# Altium PCB PCB4.PcbDoc
Units mm, origin at the board's own origin, x right, y up, seen from the top; angles counter-clockwise.
Board outline 83 x 83 mm, 4 copper layers (Top Layer, Internal Plane 1, Internal Plane 2, Bottom Layer); 24 components, 26 nets, 113 pads, 0 vias.
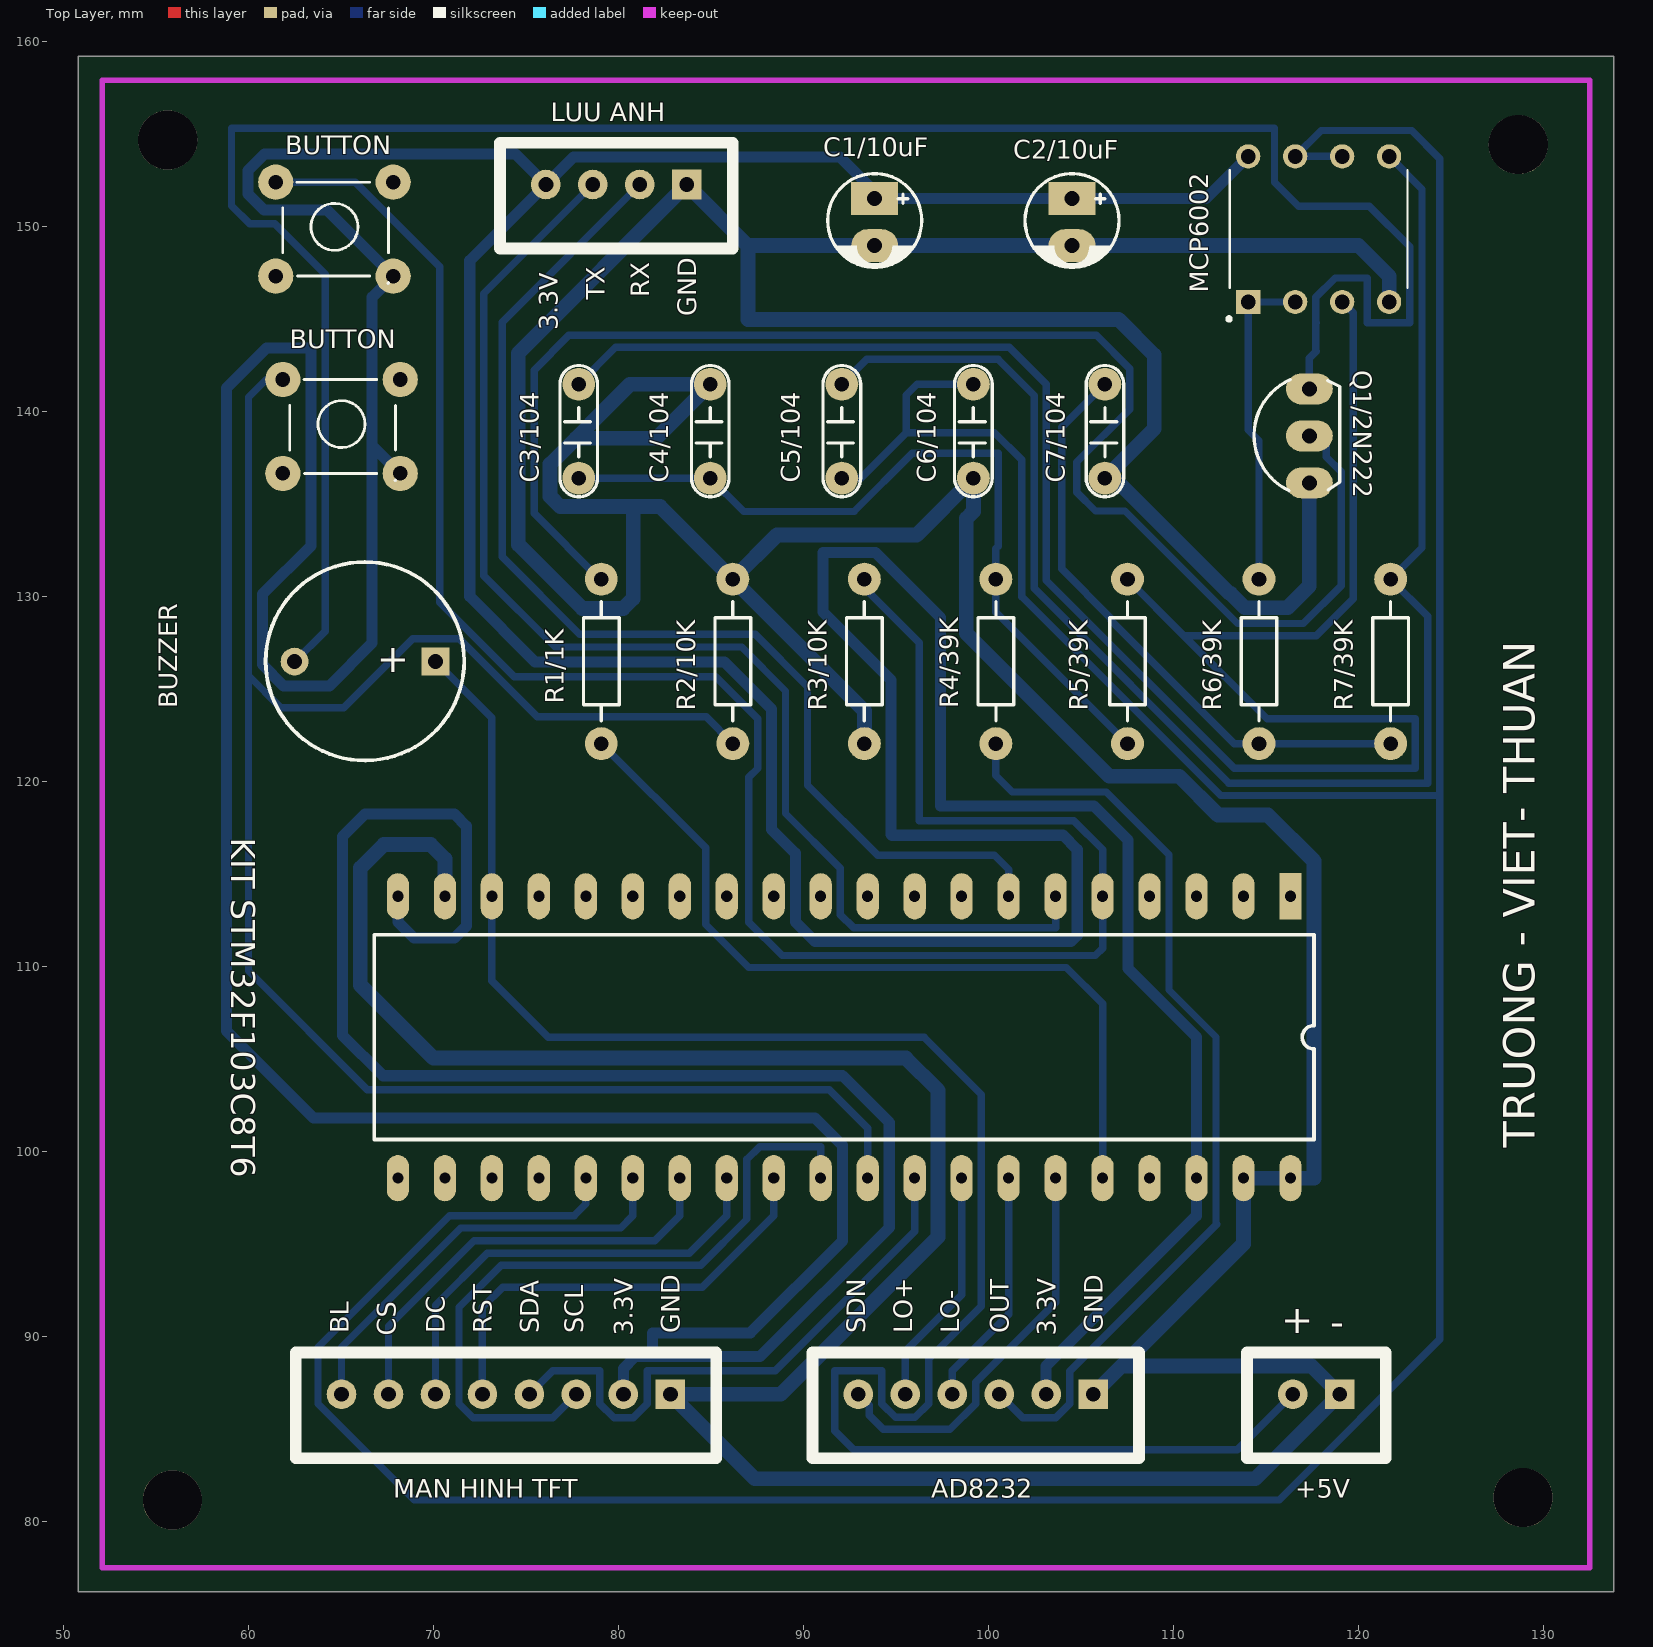
[diagram p0: Top Layer view]
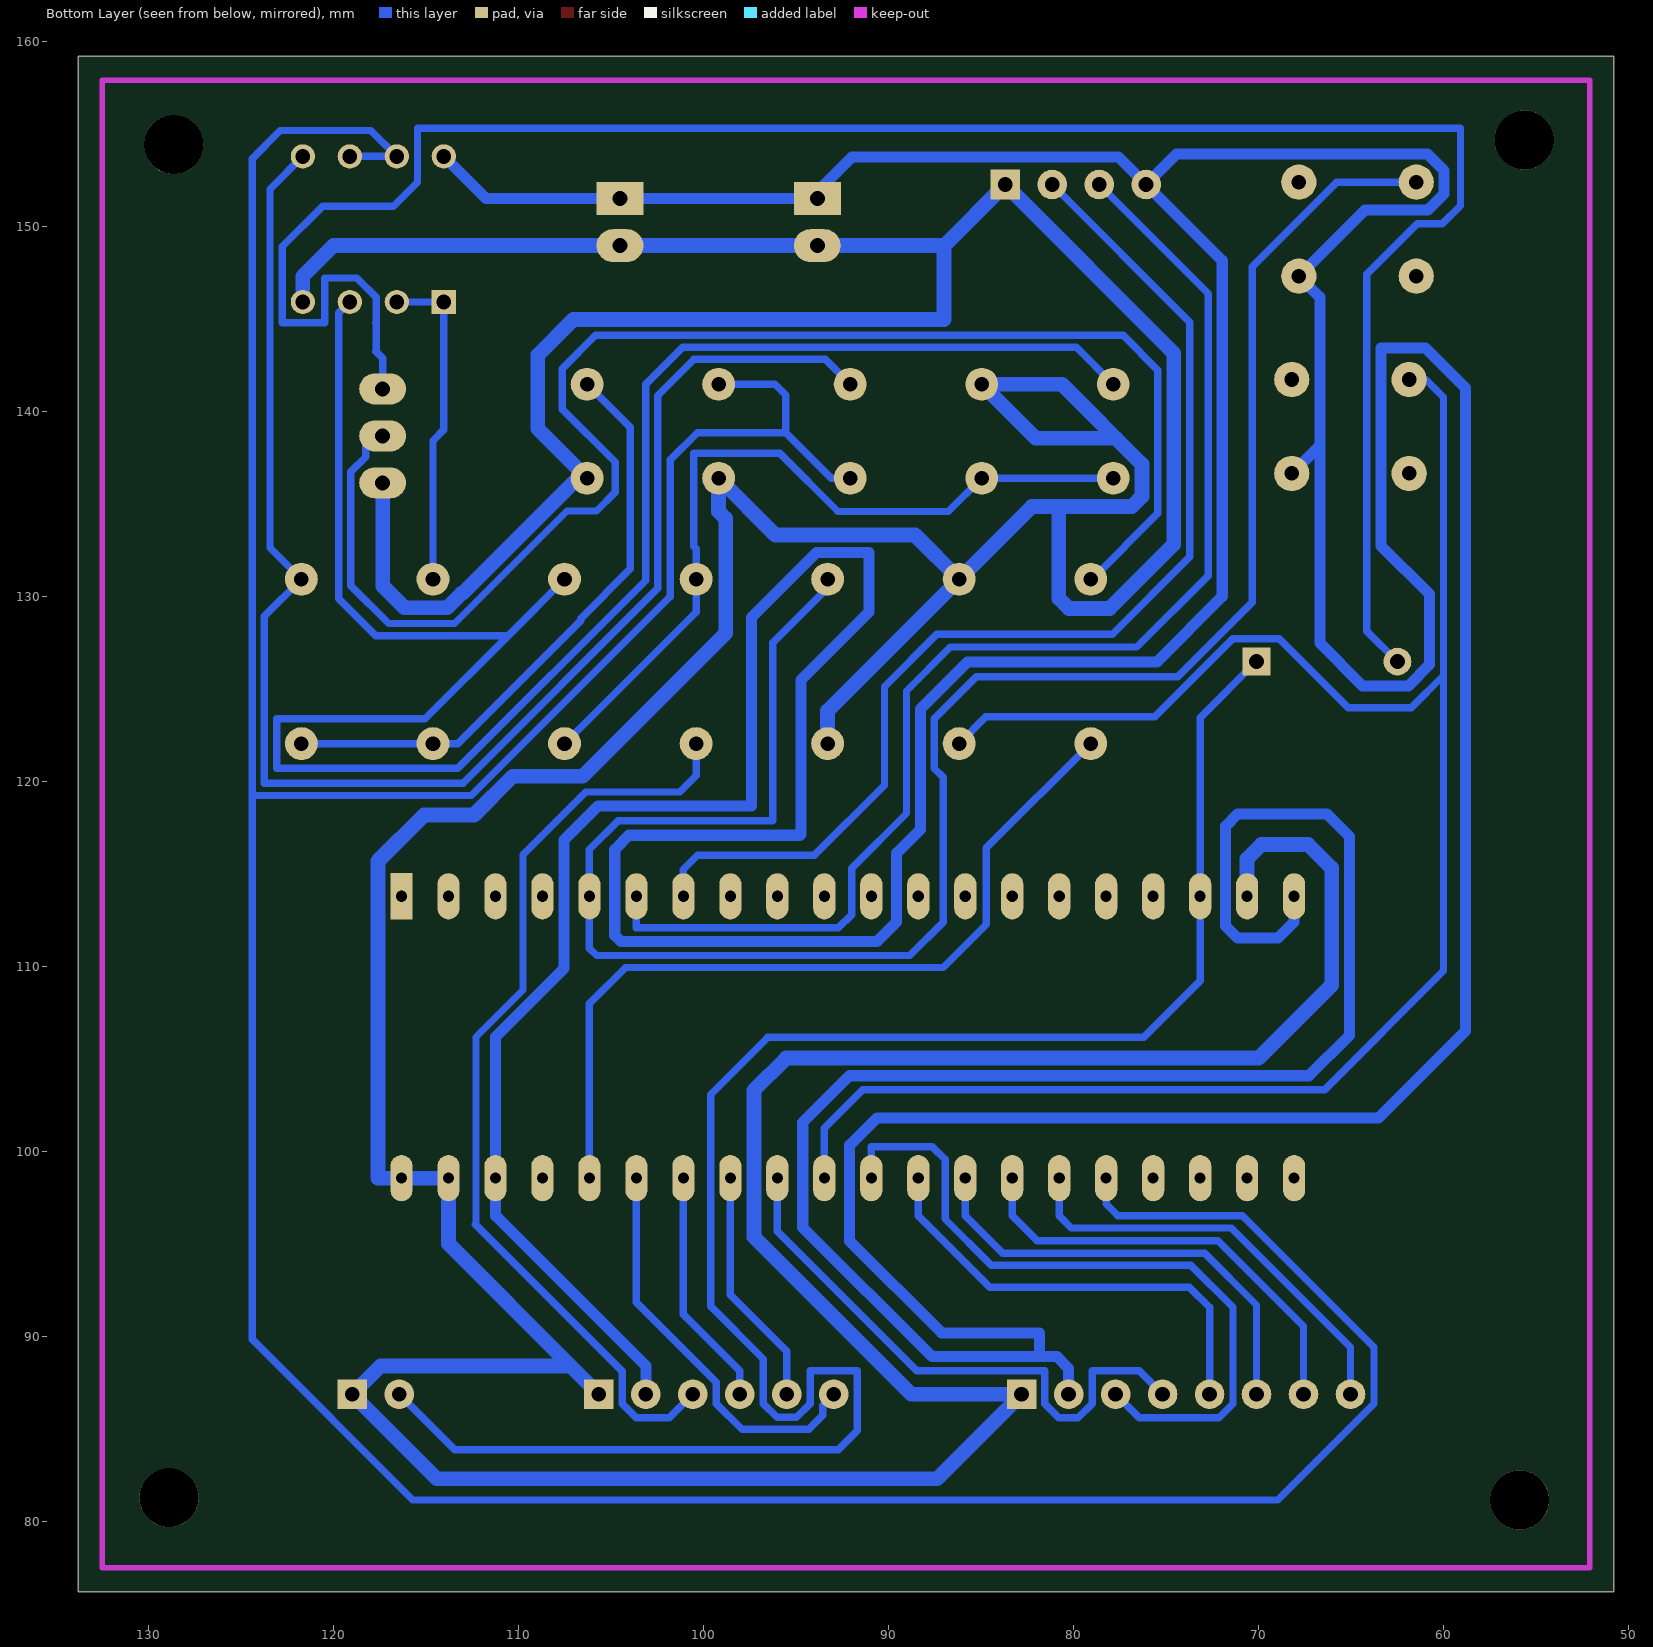
[diagram p1: Bottom Layer view, seen from below]
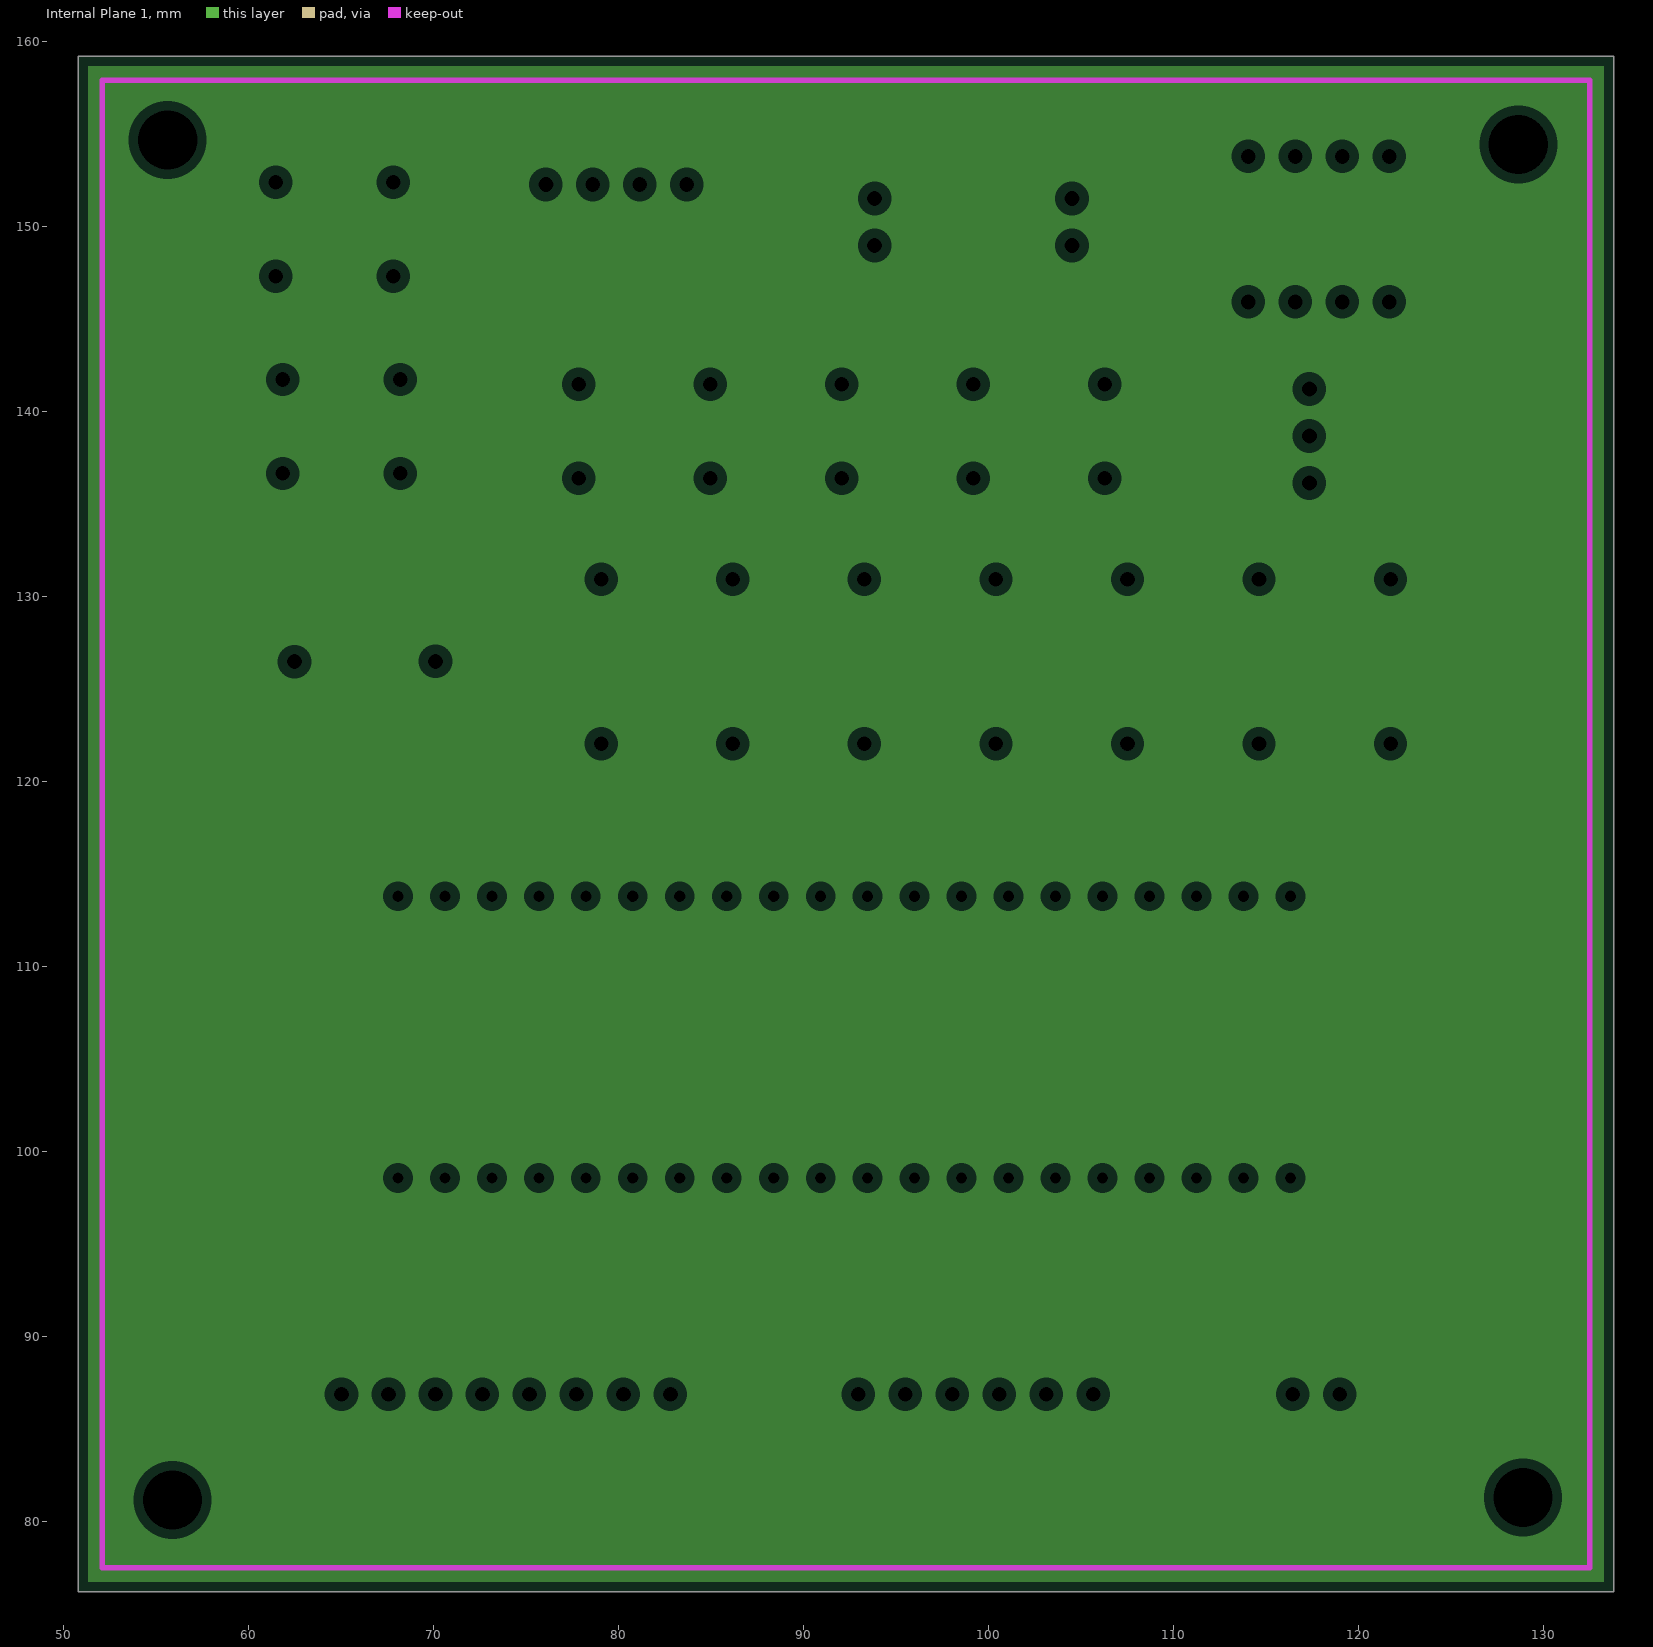
[diagram p2: Internal Plane 1, clearances drawn from the general rule]
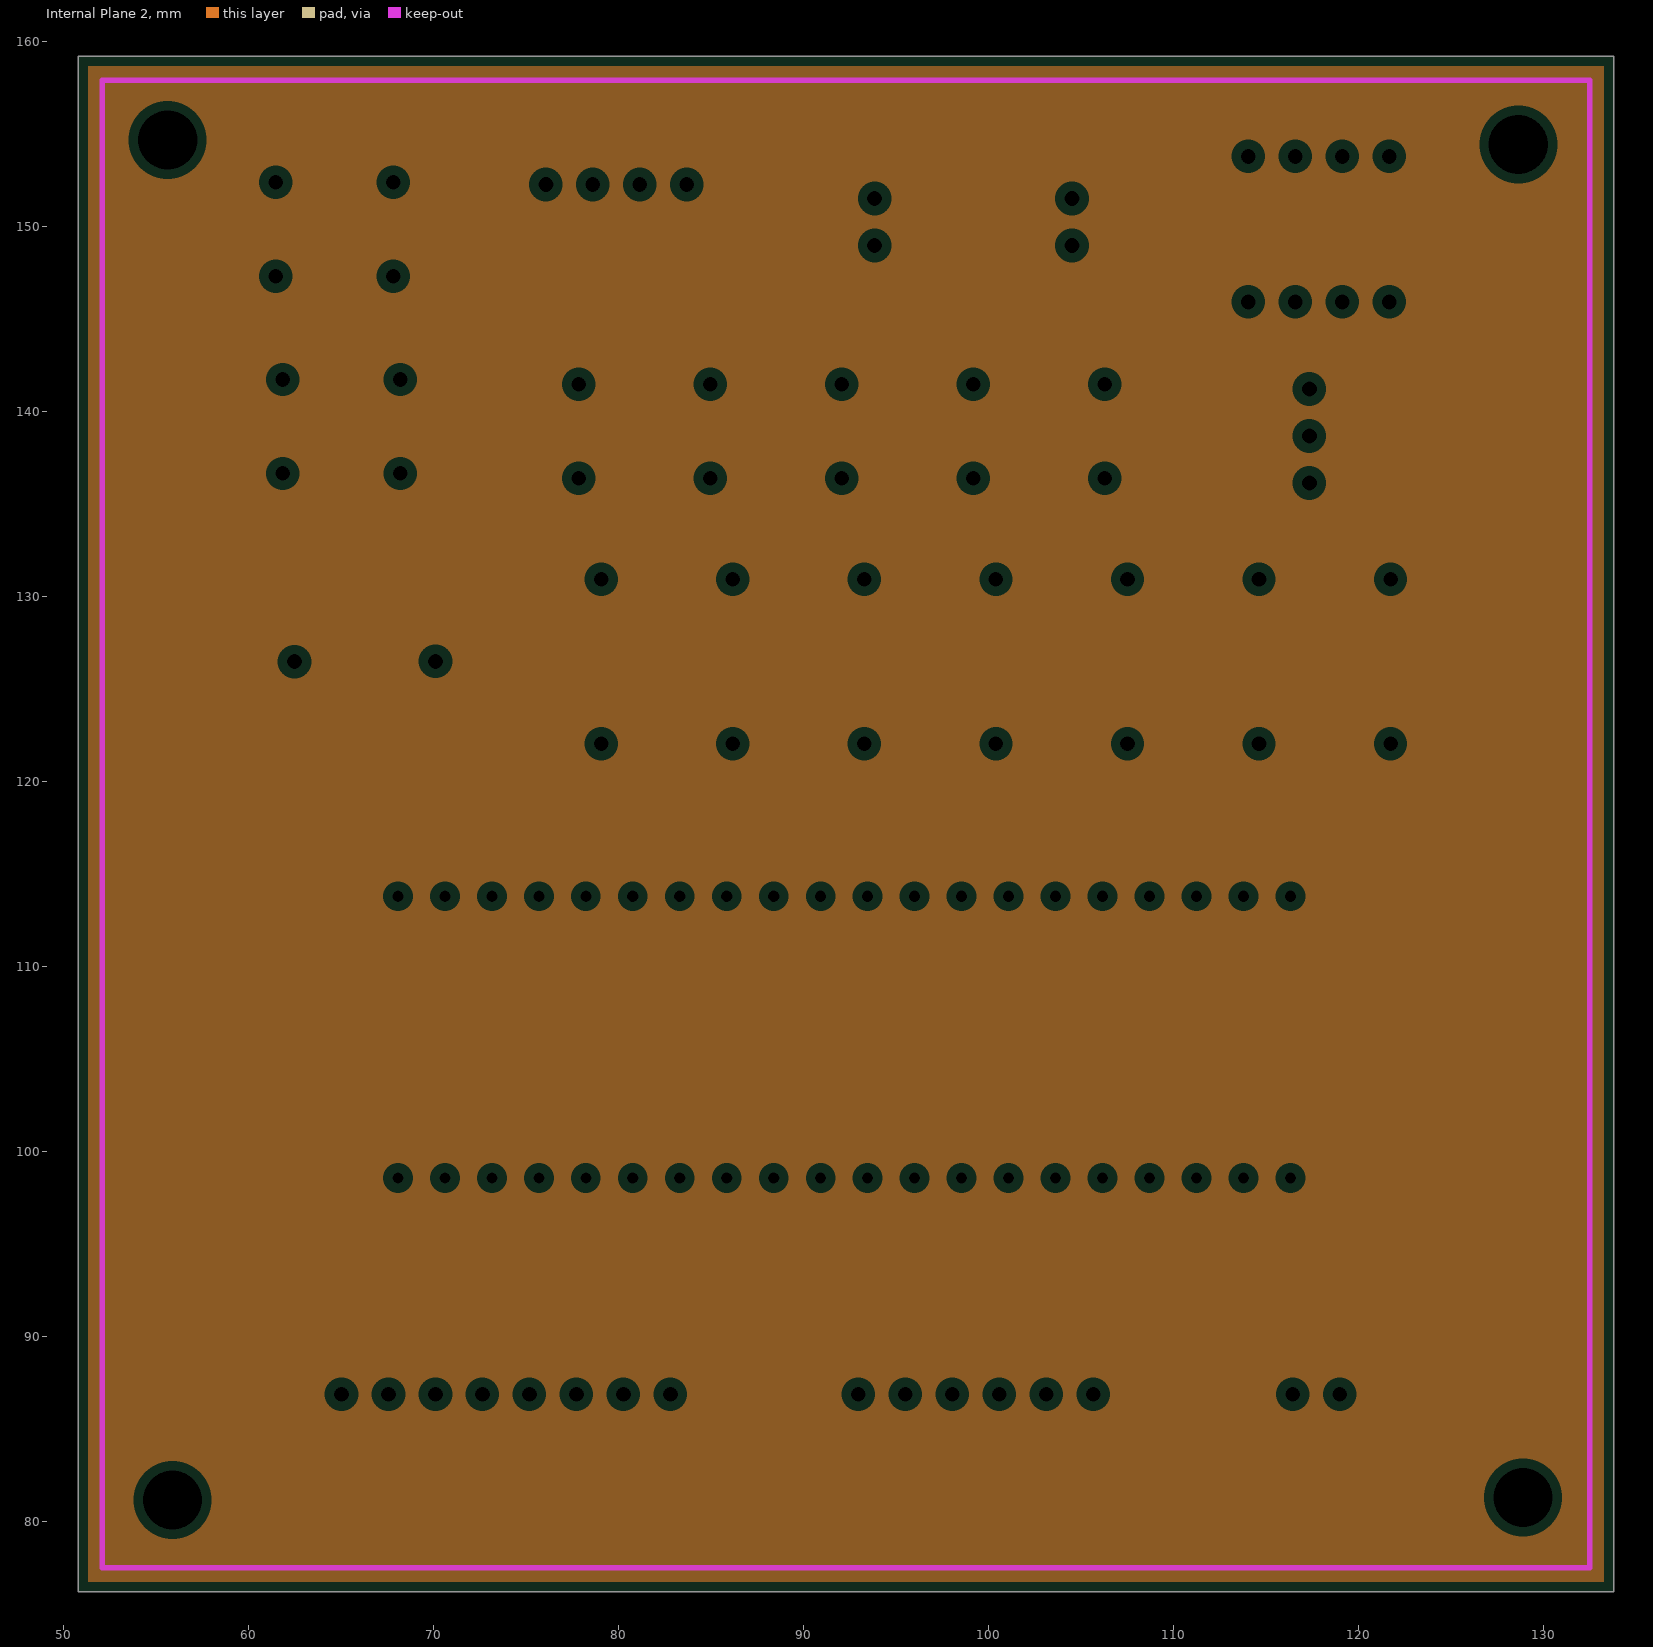
[diagram p3: Internal Plane 2, clearances drawn from the general rule]
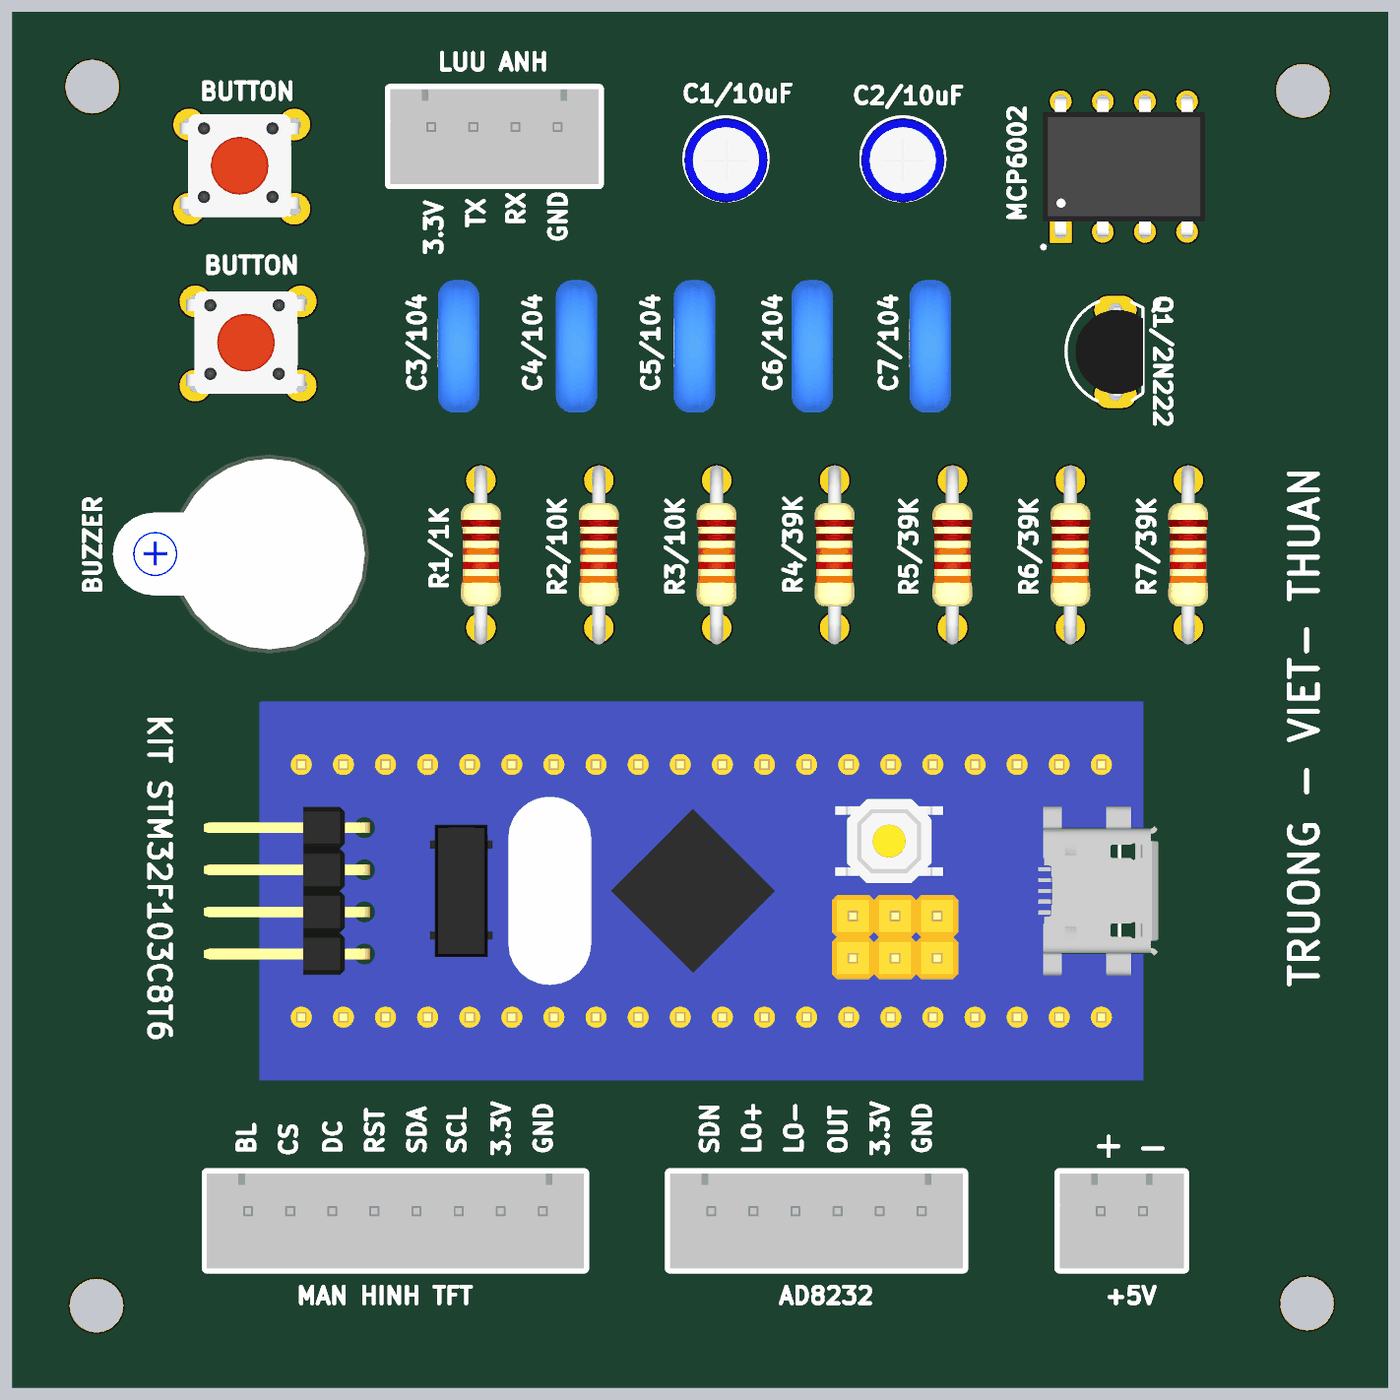
[diagram p4: 3D render of the assembled board from above, using the file's embedded part models]

## Layer stack, top to bottom
Top Layer: signal copper 0.0356
Dielectric: dielectric 0.32, FR-4, Dk 4.8
Internal Plane 1: plane copper 0.0356
Dielectric: dielectric 0.32, FR-4, Dk 4.8
Internal Plane 2: plane copper 0.0356
Dielectric: dielectric 0.32, FR-4, Dk 4.8
Bottom Layer: signal copper 0.0356

## Board outline
50.8,76.2 133.8,76.2 133.8,159.2 50.8,159.2

## Design rules (kind name [scope] priority, off if disabled: settings)
Clearance [All] p1: gap=0.25
PlaneClearance [All] p1: clearance=0.508
PlaneConnect [All] p1: planeconnectstyle=Relief reliefexpansion=0.508 reliefentries=4 reliefconductorwidth=0.254 reliefairgap=0.254
PolygonConnect [All] p1: connectstyle=Relief reliefconductorwidth=0.254 reliefentries=4 polygonreliefangle="90 Angle"
RoomDefinition "SO DO NGUYEN LY" [InComponentClass('SO DO NGUYEN LY')] p1: confinementstyle=ConfineIn formatcopy=TRUE lockcomponents=FALSE outline 135.001,77.851 310.007,77.851 310.007,138.303 135.001,138.303
RoutingLayers [All] p1: top layer_v5=FALSE bottom layer_v5=TRUE
RoutingVias [All] p1: holewidth=0.6 width=1 viastyle="Through Hole" minholewidth=0.711 minwidth=1.27 maxholewidth=0.711 maxwidth=1.27
SilkscreenOverComponentPads [All] p1: minsilkscreentomaskgap=0.254
SolderMaskExpansion [All] p1: expansion=0.102
Width GND [InNet('GND')] p1: maxlimit=0.8 minlimit=0.8 preferedwidth=0.8
Width 3.3V [InNet('3.3V')] p2: maxlimit=0.6 minlimit=0.6 preferedwidth=0.6
Width NET [All] p3: maxlimit=0.4 minlimit=0.4 preferedwidth=0.4
24 further rules are at their usual default settings.

## Components (designator, comment, footprint, x,y, rotation, side; value= is the part's Value field where it differs from the comment)
+5V "Header 2P CAP NGUON 5V" XH2.54M-2 118.999,86.868 r180 top (schematic designator H1)
AD8232 "Header 6P 2.54 - AD8232" XH2.54M-6 105.664,86.868 r180 top (schematic designator H2)
BUTTON "SW" SW4 61.849,141.732 r0 top (schematic designator UP1)
BUTTON "SW" SW4 61.468,152.4 r0 top (schematic designator DOWN1)
BUZZER "Speaker" SPEAKER 70.104,126.492 r180 top (schematic designator LS1)
C1/10uF "10uF" CP1/2 93.853,151.511 r270 top (schematic designator C1)
C2/10uF "10uF" CP1/2 104.521,151.511 r270 top (schematic designator C2)
C3/104 "104" CN2 77.851,136.398 r90 top (schematic designator C3)
C4/104 "104" CN2 84.963,136.398 r90 top (schematic designator C4)
C5/104 "104" CN2 92.075,136.398 r90 top (schematic designator C5)
C6/104 "104" CN2 99.187,136.398 r90 top (schematic designator C6)
C7/104 "104" CN2 106.299,136.398 r90 top (schematic designator C7)
"KIT STM32F103C8T6" "KIT STM32F103C8T6" "STM32F103 KIT" 116.332,113.792 r270 top
"LUU ANH" "Header 4P KHOI LUU HINH ANH" XH2.54M-4 83.693,152.273 r180 top (schematic designator H4)
"MAN HINH TFT" "Header 8P 2.54 CAM MAN HINH" XH2.54M-8 82.804,86.868 r180 top (schematic designator H3)
MCP6002 "MCP6002-I/P" DIP787W46P254L927H533Q8 117.856,149.86 r90 top (schematic designator U1)
Q1/2N222 "2N222" TO92-123 117.348,138.684 r90 top (schematic designator Q1)
R1/1K "1k" R1/4W 79.07,122.047 r90 top (schematic designator R1)
R2/10K "10k" R1/4W 86.182,122.047 r90 top (schematic designator R2)
R3/10K "10k" R1/4W 93.294,122.047 r90 top (schematic designator R3)
R4/39K "39K" R1/4W 100.406,122.047 r90 top (schematic designator R4)
R5/39K "39K" R1/4W 107.518,122.047 r90 top (schematic designator R5)
R6/39K "39K" R1/4W 114.63,122.047 r90 top (schematic designator R6)
R7/39K "39K" R1/4W 121.742,122.047 r90 top (schematic designator R7)

## Footprints (in the part's own frame and the unit in brackets; to place one, negate y for a bottom-side part, rotate by r counter-clockwise, add the part's x,y. Pads: shape width x height; smd on the part's side, far side on the other; paste and mask are expansions set on the pad)
CN2 [mil]
  round 70 hole 31: 1(0,0) 2(200,0)
  silkscreen extent -40,-40 240,40, body extent -54,-44 260,55, height 407
CP1/2 [mil] "Tu hoa < 22uF/16>50V"
  rect 70x100 hole 32: 1(0,0)
  oval 70x100 hole 32: 2(100,0)
  silkscreen extent -53,-100 146,100, body extent -49,-99 149,99, height 287
DIP787W46P254L927H533Q8 [mm]
  rect 1.308x1.308 / inner round 1.308 / far side rect 1.308x1.308 hole 0.8: 1(-3.935,3.81)
  round 1.308 hole 0.8: 2(-3.935,1.27) 3(-3.935,-1.27) 4(-3.935,-3.81) 5(3.935,-3.81) 6(3.935,-1.27) 7(3.935,1.27) 8(3.935,3.81)
  silkscreen extent -4.95,-4.8 3.18,4.95, body extent -4.19,-4.89 4.19,4.89, height 4.32
R1/4W [mil] "R 1/4W, 2 Pin, 350mil"
  round 70 hole 31: 1(0,0) 2(350,0)
  silkscreen extent 48,-38 302,38, body extent -40,-47 386,47, height 111
SPEAKER [mm]
  rect 1.5x1.5 hole 0.8: 1(0,0)
  round 1.5 hole 0.8: 2(7.62,0.013)
  silkscreen extent -1.55,-5.38 9.18,5.36, body extent -2.22,-6 13.24,6, height 4.5
"STM32F103 KIT" [mm]
  rect 2.5x1.2 hole 0.6: 1(0,0)
  oval 2.5x1.2 hole 0.6: 2(0,-2.54) 3(0,-5.08) 4(0,-7.62) 5(0,-10.16) 6(0,-12.7) 7(0,-15.24) 8(0,-17.78) 9(0,-20.32) 10(0,-22.86) 11(0,-25.4) 12(0,-27.94) 13(0,-30.48) 14(0,-33.02) 15(0,-35.56) 16(0,-38.1) 17(0,-40.64) 18(0,-43.18) 19(0,-45.72) 20(0,-48.26) 21(15.24,-48.26) 22(15.24,-45.72) 23(15.24,-43.18) 24(15.24,-40.64) 25(15.24,-38.1) 26(15.24,-35.56) 27(15.24,-33.02) 28(15.24,-30.48) 29(15.24,-27.94) 30(15.24,-25.4) 31(15.24,-22.86) 32(15.24,-20.32) 33(15.24,-17.78) 34(15.24,-15.24) 35(15.24,-12.7) 36(15.24,-10.16) 37(15.24,-7.62) 38(15.24,-5.08) 39(15.24,-2.54) 40(15.24,0)
  silkscreen extent 2.08,-49.53 13.16,1.27, body extent -3.81,-53.97 19.05,3.59, height 16.12
SW4 [mil] "SW button 4pin, 250 x250 mil"
  round 75 hole 31: 1(0,0) 2(250,-200) 3(250,0) 4(0,-200)
  silkscreen extent 15,-215 240,0, body extent -36,-220 276,24, height 276
TO92-123 [mil] "TO-92"
  oval 66x100 hole 32: 1(-100,0) 2(0,0) 3(100,0)
  silkscreen extent -117,-65 120,118, body extent -109,-66 109,95, height 245
XH2.54M-2 [mm]
  rect 1.6x1.6 hole 0.8: 1(0,0)
  round 1.6 hole 0.8: 2(2.54,0)
  silkscreen extent -2.48,-2.26 5.02,3.46, body extent -2.48,-2.26 5.02,3.48, height 6.91
XH2.54M-4 [mm]
  rect 1.6x1.6 hole 0.8: 1(0,0)
  round 1.6 hole 0.8: 2(2.54,0) 3(5.08,0) 4(7.62,0)
  silkscreen extent -2.48,-2.26 10.1,3.46, body extent -2.48,-2.26 10.1,3.48, height 6.91
XH2.54M-6 [mm]
  rect 1.6x1.6 hole 0.8: 1(0,0)
  round 1.6 hole 0.8: 2(2.54,0) 3(5.08,0) 4(7.62,0) 5(10.16,0) 6(12.7,0)
  silkscreen extent -2.48,-2.26 15.18,3.46, body extent -2.48,-2.26 15.18,3.48, height 6.91
XH2.54M-8 [mm]
  rect 1.6x1.6 hole 0.8: 1(0,0)
  round 1.6 hole 0.8: 2(2.54,0) 3(5.08,0) 4(7.62,0) 5(10.16,0) 6(12.7,0) 7(15.24,0) 8(17.78,0)
  silkscreen extent -2.48,-2.26 20.26,3.46, body extent -2.48,-2.26 20.26,3.48, height 6.91

## Part data
+5V: library part "Header 2P 2.54 Duc Thang", "C?m"
AD8232: library part "Header 6P 2.54 Duc Thang", "C?m"
BUTTON BUTTON: library part SW4, "Switch button 4 pin"
BUZZER: "Loudspeaker"
C1/10uF C2/10uF: library part CP1, "Cap P  0,1uF < 22uF , 16 - 50V"
C3/104 C4/104 C5/104 C6/104 C7/104: library part CN2, "Cap np 104 => 105pF"
"KIT STM32F103C8T6": library part "STM32f103 Bluepill", "KIT STM32F103C8T6 Bluepill"
"LUU ANH": library part "Header 4P 2.54 Duc Thang", "C?m"
"MAN HINH TFT": library part "Header 8P 2.54 Duc Thang", "C?m"
MCP6002: "Microchip ,Dual Op Amp,1MHz CMOS,Rail to Rail,3V,5V,8-Pin PDIP"
Q1/2N222: "NPN 600mW, ECB"
R1/1K R2/10K R3/10K R4/39K R5/39K R6/39K R7/39K: library part R1/4W, "Resistor 1/4W"

## Free pads (board coordinates)
  round 3.2 hole 3.2: 0(55.626,154.686) 1(128.651,154.432) 2(128.905,81.28) 3(55.88,81.153)

## Nets (pads, with @x,y where several pads share a name; then routed paths per layer and width w, separated by ;. In a path a pad name is that pad's centre, name@x,y a point inside that pad or via, vN(x,y) a via of type N, cw(c..) or ccw(c..) an arc to the next point about the centre after c; other vN are vias at no path point)
3.3V: "KIT STM32F103C8T6.20" "KIT STM32F103C8T6.38" "LUU ANH.4" "MAN HINH TFT.2" AD8232.2 BUTTON.2 C1/10uF.1 C2/10uF.1 MCP6002.8 | length 463.4
  Bottom Layer w0.6: 68.072,113.792 68.072,112.395 68.936,111.531 71.12,111.531 71.78,112.192 71.78,117.577 71.12,118.237 66.294,118.237 65.075,117.018 65.075,106.274 67.258,104.091 92.099,104.091 94.64,101.549 94.64,95.885 87.655,88.9 81.839,88.9 ; BUTTON.2@68.199,136.652 66.675,138.176 ; 80.264,86.868 80.264,88.265 80.899,88.9 81.839,88.9 ; AD8232.2 103.124,88.392 111.252,96.52 111.252,98.552 111.252,106.172 107.544,109.88 107.544,116.84 105.702,118.682 97.409,118.682 97.409,128.857 93.89,132.376 91.059,132.376 91.059,129.159 94.742,125.476 94.742,117.145 94.793,117.094 104.038,117.094 104.8,116.332 104.8,111.67 104.47,111.34 90.615,111.34 89.56,112.395 89.56,116.117 88.278,117.399 88.278,123.913 85.725,126.467 75.489,126.467 71.958,129.997 71.958,148.158 76.073,152.273 ; MCP6002.8 111.762,151.511 C2/10uF.1 C1/10uF.1 93.853,151.892 91.973,153.772 77.572,153.772 76.073,152.273 ; 66.675,138.176 66.675,146.177 67.818,147.32 64.241,150.897 60.833,150.897 59.965,151.765 59.965,153.035 60.854,153.924 74.422,153.924 76.073,152.273 ; 66.675,138.176 66.675,127.483 64.364,125.171 61.9,125.171 60.757,126.314 60.757,130.124 63.373,132.74 63.373,143.434 60.96,143.434 58.801,141.275 58.801,106.502 63.5,101.803 90.627,101.803 92.1,100.33 92.1,95.148 87.122,90.17 81.839,90.17 81.839,88.9
5V: "KIT STM32F103C8T6.18" +5V.2 BUZZER.1 | length 102.6
  Bottom Layer w0.4: BUZZER.1 73.152,123.444 73.152,113.792 73.152,109.22 76.2,106.172 96.52,106.172 99.619,103.073 99.619,91.618 96.774,88.773 96.774,86.36 96.032,85.618 94.976,85.618 94.234,86.36 94.234,88.138 91.694,88.138 91.694,84.887 92.71,83.871 113.462,83.871 +5V.2
"BL - PA1": "KIT STM32F103C8T6.26" "MAN HINH TFT.8" | length 23.3
  Bottom Layer w0.4: 65.024,86.868 65.024,89.408 71.476,95.86 80.112,95.86 80.772,96.52 80.772,98.552
"CS - PA2": "KIT STM32F103C8T6.27" "MAN HINH TFT.7" | length 23.9
  Bottom Layer w0.4: 67.564,86.868 67.564,90.551 72.187,95.174 81.966,95.174 83.312,96.52 83.312,98.552
"DC - PA3": "KIT STM32F103C8T6.28" "MAN HINH TFT.6" | length 24.6
  Bottom Layer w0.4: 70.104,86.868 70.104,91.694 72.912,94.502 83.834,94.502 85.852,96.52 85.852,98.552
GND: "KIT STM32F103C8T6.19" "KIT STM32F103C8T6.39" "KIT STM32F103C8T6.40" "LUU ANH.1" "MAN HINH TFT.1" +5V.1 AD8232.1 C1/10uF.2 C2/10uF.2 C4/104.2 C6/104.1 C7/104.1 MCP6002.4 Q1/2N222.1 R2/10K.2 R3/10K.1 | length 385.7
  Bottom Layer w0.8: 70.612,113.792 70.612,115.824 69.85,116.586 67.31,116.586 66.04,115.316 66.04,108.997 69.997,105.041 95.537,105.041 97.282,103.296 97.282,95.377 88.773,86.868 82.804,86.868 87.376,82.296 114.427,82.296 +5V.1 117.475,88.392 107.188,88.392 ; 77.699,138.557 82.042,138.557 C4/104.2 80.62,141.478 76.302,137.16 76.302,135.406 76.848,134.859 82.26,134.859 R2/10K.2 ; 80.787,134.859 80.797,134.849 80.797,129.896 80.258,129.357 78.037,129.357 74.574,132.819 74.574,143.154 83.693,152.273 86.995,148.971 ; R3/10K.1 93.294,123.825 R2/10K.2 ; AD8232.1 107.188,88.392 ; Q1/2N222.1 117.348,130.566 116.169,129.388 113.868,129.388 113.081,130.175 113.03,130.175 106.807,136.398 C7/104.1 108.966,139.065 108.966,143.053 107.036,144.983 86.995,144.983 86.995,148.971 ; MCP6002.4 121.666,147.32 120.015,148.971 C2/10uF.2 C1/10uF.2 86.995,148.971 ; R2/10K.2 88.571,133.326 96.115,133.326 C6/104.1 99.187,134.595 98.806,134.214 98.806,128.016 106.54,120.282 110.316,120.282 112.412,118.186 115.113,118.186 117.602,115.697 117.602,98.552 113.792,98.552 113.792,94.996 107.188,88.392
NetC3_1: C3/104.1 C4/104.1 R4/39K.2 R5/39K.1 | length 43.4
  Bottom Layer w0.4: C3/104.1 C4/104.1 86.766,134.595 92.735,134.595 95.885,137.744 100.526,137.744 100.526,132.715 100.406,132.595 R4/39K.2 100.406,129.159 R5/39K.1
NetC3_2: C3/104.2 MCP6002.3 R5/39K.2 | length 109.3
  Bottom Layer w0.4: C3/104.2 79.84,143.467 101.135,143.467 103.124,141.478 103.124,130.868 113.284,120.708 123.081,120.708 123.081,123.393 115.062,123.393 110.568,127.888 ; R5/39K.2 110.568,127.888 ; MCP6002.3 119.718,145.333 119.718,129.878 117.728,127.888 110.568,127.888
NetC5_2: C5/104.2 MCP6002.5 R7/39K.2 | length 83.9
  Bottom Layer w0.4: C5/104.2 93.345,142.748 ; 93.414,142.817 100.526,142.817 102.474,140.869 102.474,130.444 113.005,119.913 123.749,119.913 123.749,128.93 R7/39K.2 123.444,132.639 123.444,152.017 MCP6002.5
NetC7_2: C7/104.2 R6/39K.1 R7/39K.1 | length 32.7
  Bottom Layer w0.4: C7/104.2 103.962,139.141 103.962,131.496 106.651,128.807 106.651,128.68 113.284,122.047 R7/39K.1
NetLS1_2: BUZZER.2 Q1/2N222.3 | length 118.2
  Bottom Layer w0.4: BUZZER.2 64.135,128.13 64.135,147.422 61.409,150.147 60.058,150.147 59.076,151.13 59.076,155.321 115.468,155.321 115.468,152.4 116.764,151.105 120.599,151.105 122.784,148.92 122.784,144.805 120.472,144.805 120.472,147.218 118.745,147.218 117.704,146.177 117.704,144.831 ; 117.348,142.875 Q1/2N222.3 Q1/2N222.3@117.729,141.605 ; 117.373,142.9 117.704,143.231 ; 117.729,143.256 117.704,143.231 ; 117.729,144.805 117.704,144.831 ; 117.704,143.231 117.704,144.831
NetQ1_2: Q1/2N222.2 R1/1K.2 | length 81.9
  Bottom Layer w0.4: R1/1K.2 78.994,130.937 75.438,134.493 75.438,142.24 77.315,144.117 105.844,144.117 107.638,142.323 107.638,140.132 104.775,137.269 104.775,135.636 105.791,134.62 107.383,134.62 113.465,128.538 117.019,128.538 119.068,130.586 119.068,136.735 118.262,137.541 118.262,138.684 Q1/2N222.2
NetR6_2: MCP6002.1 MCP6002.2 R6/39K.2 | length 17.8
  Bottom Layer w0.4: R6/39K.2 114.63,138.43 114.046,139.014 MCP6002.1 MCP6002.2
"PA0 - IN (OUTPUT)": AD8232.3 R4/39K.1 | length 51.5
  Bottom Layer w0.4: R4/39K.1 100.406,120.32 101.294,119.432 106.374,119.432 109.762,116.044 109.762,108.723 112.302,106.183 112.302,96.11 ; AD8232.3 101.854,85.598 103.632,85.598 104.394,86.36 104.394,88.118 112.344,96.068
"PA0 - OUT": "KIT STM32F103C8T6.25" C5/104.1 C6/104.2 MCP6002.6 MCP6002.7 | length 215.7
  Bottom Layer w0.4: 78.232,98.552 78.232,97.155 77.597,96.52 70.866,96.52 63.754,89.408 63.754,86.36 68.961,81.153 115.722,81.153 124.409,89.84 124.409,119.239 ; C5/104.1 93.091,136.398 95.555,138.862 ; C6/104.2 96.139,141.478 95.555,140.894 95.555,138.862 ; MCP6002.6 MCP6002.7 117.985,155.194 122.885,155.194 124.409,153.67 124.409,119.239 ; 95.555,138.862 100.33,138.862 101.803,137.389 101.803,129.997 112.561,119.239 124.409,119.239
PA6: "KIT STM32F103C8T6.31" BUTTON.1@61.849,141.732 R2/10K.1 | length 117.9
  Bottom Layer w0.4: 59.995,139.878 59.995,125.73 ; BUTTON.1@61.849,141.732 60.96,141.732 59.995,140.767 59.995,125.73 ; R2/10K.1 84.734,123.495 75.611,123.495 71.395,127.711 68.885,127.711 65.151,123.977 61.747,123.977 59.995,125.73 ; 93.472,98.552 93.472,101.255 91.386,103.341 66.411,103.341 59.995,109.757 59.995,125.73
PA8: "KIT STM32F103C8T6.5" BUTTON.1@61.468,152.4 R3/10K.2 | length 110.1
  Bottom Layer w0.4: BUTTON.1@61.468,152.4 65.761,152.4 70.333,147.828 70.333,129.692 74.371,125.654 85.268,125.654 87.528,123.393 87.528,120.701 87.046,120.218 87.046,112.395 88.851,110.59 105.774,110.59 106.172,110.988 106.172,113.792 106.172,116.319 104.624,117.868 96.266,117.868 96.266,127.508 93.294,130.48 R3/10K.2
"PB0 - LO+": "KIT STM32F103C8T6.33" AD8232.5 | length 12.9
  Bottom Layer w0.4: AD8232.5 95.504,89.203 98.552,92.251 98.552,98.552
"PB1 - LO-": "KIT STM32F103C8T6.34" AD8232.4 | length 12.9
  Bottom Layer w0.4: AD8232.4 98.044,88.148 101.092,91.196 101.092,98.552
"PB10 - SDN": "KIT STM32F103C8T6.35" AD8232.6 | length 22
  Bottom Layer w0.4: AD8232.6 93.556,86.276 93.556,85.725 94.314,84.968 97.922,84.968 99.314,86.36 99.314,87.518 103.632,91.836 103.632,98.552
PB11: "KIT STM32F103C8T6.36" R1/1K.1 | length 44.8
  Bottom Layer w0.4: R1/1K.1 84.709,116.408 84.709,112.268 87.037,109.94 104.207,109.94 106.172,107.975 106.172,98.552
"RST - PA4": "KIT STM32F103C8T6.29" "MAN HINH TFT.5" | length 24.5
  Bottom Layer w0.4: 72.644,86.868 72.644,91.567 73.736,92.659 84.531,92.659 88.392,96.52 88.392,98.552
RX: "KIT STM32F103C8T6.7" "LUU ANH.2" | length 62.2
  Bottom Layer w0.4: 81.153,152.273 73.711,144.831 73.711,132.149 77.894,127.965 87.384,127.965 90.221,125.128 90.221,119.799 94.018,116.002 100.33,116.002 101.092,115.24 101.092,113.792
"SCL - PA5": "KIT STM32F103C8T6.30" "MAN HINH TFT.3" | length 39.1
  Bottom Layer w0.4: 77.724,86.868 76.454,85.598 72.136,85.598 71.374,86.36 71.374,91.567 73.659,93.852 84.454,93.852 86.944,96.342 86.944,99.568 87.63,100.254 90.932,100.254 90.932,98.552
"SDA - PA7": "KIT STM32F103C8T6.32" "MAN HINH TFT.4" | length 31.5
  Bottom Layer w0.4: 75.184,86.868 76.454,88.138 78.994,88.138 78.994,86.36 79.756,85.598 80.792,85.598 81.554,86.36 81.554,88.138 88.471,88.138 96.012,95.679 96.012,98.552
TX: "KIT STM32F103C8T6.6" "LUU ANH.3" | length 69.4
  Bottom Layer w0.4: 78.613,152.273 72.72,146.38 72.72,131.121 76.574,127.267 86.654,127.267 89.028,124.893 89.028,118.269 91.999,115.299 91.999,112.801 92.71,112.09 103.632,112.09 103.632,113.792
pads on no net: "KIT STM32F103C8T6.1" "KIT STM32F103C8T6.2" "KIT STM32F103C8T6.3" "KIT STM32F103C8T6.4" "KIT STM32F103C8T6.8" "KIT STM32F103C8T6.9" "KIT STM32F103C8T6.10" "KIT STM32F103C8T6.11" "KIT STM32F103C8T6.12" "KIT STM32F103C8T6.13" "KIT STM32F103C8T6.14" "KIT STM32F103C8T6.15" "KIT STM32F103C8T6.16" "KIT STM32F103C8T6.17" "KIT STM32F103C8T6.21" "KIT STM32F103C8T6.22" "KIT STM32F103C8T6.23" "KIT STM32F103C8T6.24" "KIT STM32F103C8T6.37" BUTTON.3 BUTTON.4

## Polygon pours and split planes (outlines as drawn)
no net on Internal Plane 1 (split plane): 133.29,76.71 51.31,76.71 51.31,158.69 133.29,158.69
no net on Internal Plane 2 (split plane): 133.29,76.71 51.31,76.71 51.31,158.69 133.29,158.69

## Keep-outs
Keep-Out Layer:
  lines w0.3: 52.1,77.5 52.1,157.9 132.5,157.9 132.5,77.5 52.1,77.5

## Silkscreen, mask and mechanical layers (free items; w line width, h text height)
Top Overlay:
  text "RX" at 81.661,146.177 h1 r90
  text "TX" at 79.248,146.05 h1 r90
  text "GND" at 84.201,145.161 h1 r90
  text "3.3V" at 76.708,144.399 h1 r90
  text "TRUONG - VIET- THUAN" at 129.54,100.203 h1.7 r90
  text "BL" at 65.405,90.17 h1 r90
  text "DC" at 70.612,90.17 h1 r90
  text "RST" at 73.152,90.17 h1 r90
  text "SDA" at 75.692,90.17 h1 r90
  text "SCL" at 78.105,90.17 h1 r90
  text "GND" at 83.312,90.17 h1 r90
  text "SDN" at 93.345,90.17 h1 r90
  text "LO+" at 95.885,90.17 h1 r90
  text "LO-" at 98.425,90.17 h1 r90
  text "OUT" at 101.092,90.17 h1 r90
  text "GND" at 106.172,90.17 h1 r90
  text "+" at 115.824,90.17 h1.52
  text "CS" at 67.945,90.043 h1 r90
  text "3.3V" at 80.772,90.043 h1 r90
  text "3.3V" at 103.632,90.043 h1 r90
  text "-" at 118.491,90.043 h1.52
Drill Drawing:
  text ".LEGEND" at 138.88,81.28 h1.52
  text "Drill Drawing." at 138.88,78.74 h1.52

## Dimensions
52.1,77.5 to 52.1,157.9 on Mechanical 1
52.1,77.5 to 132.5,77.5 on Mechanical 1

## Text inside footprints (layer, text, board x,y; h text height)
BUZZER: Top Overlay "+" at 68.694,127.203 h1.52 r180